# Altium PCB ledcube_v2.PcbDoc (part 15 of 18)
Units mil, origin at the board's own origin, x right, y up, seen from the top; angles counter-clockwise.
Board outline 3130 x 3300 mil, 2 copper layers (Top Layer, Bottom Layer); 188 components, 216 nets, 29515 pads, 250 vias.
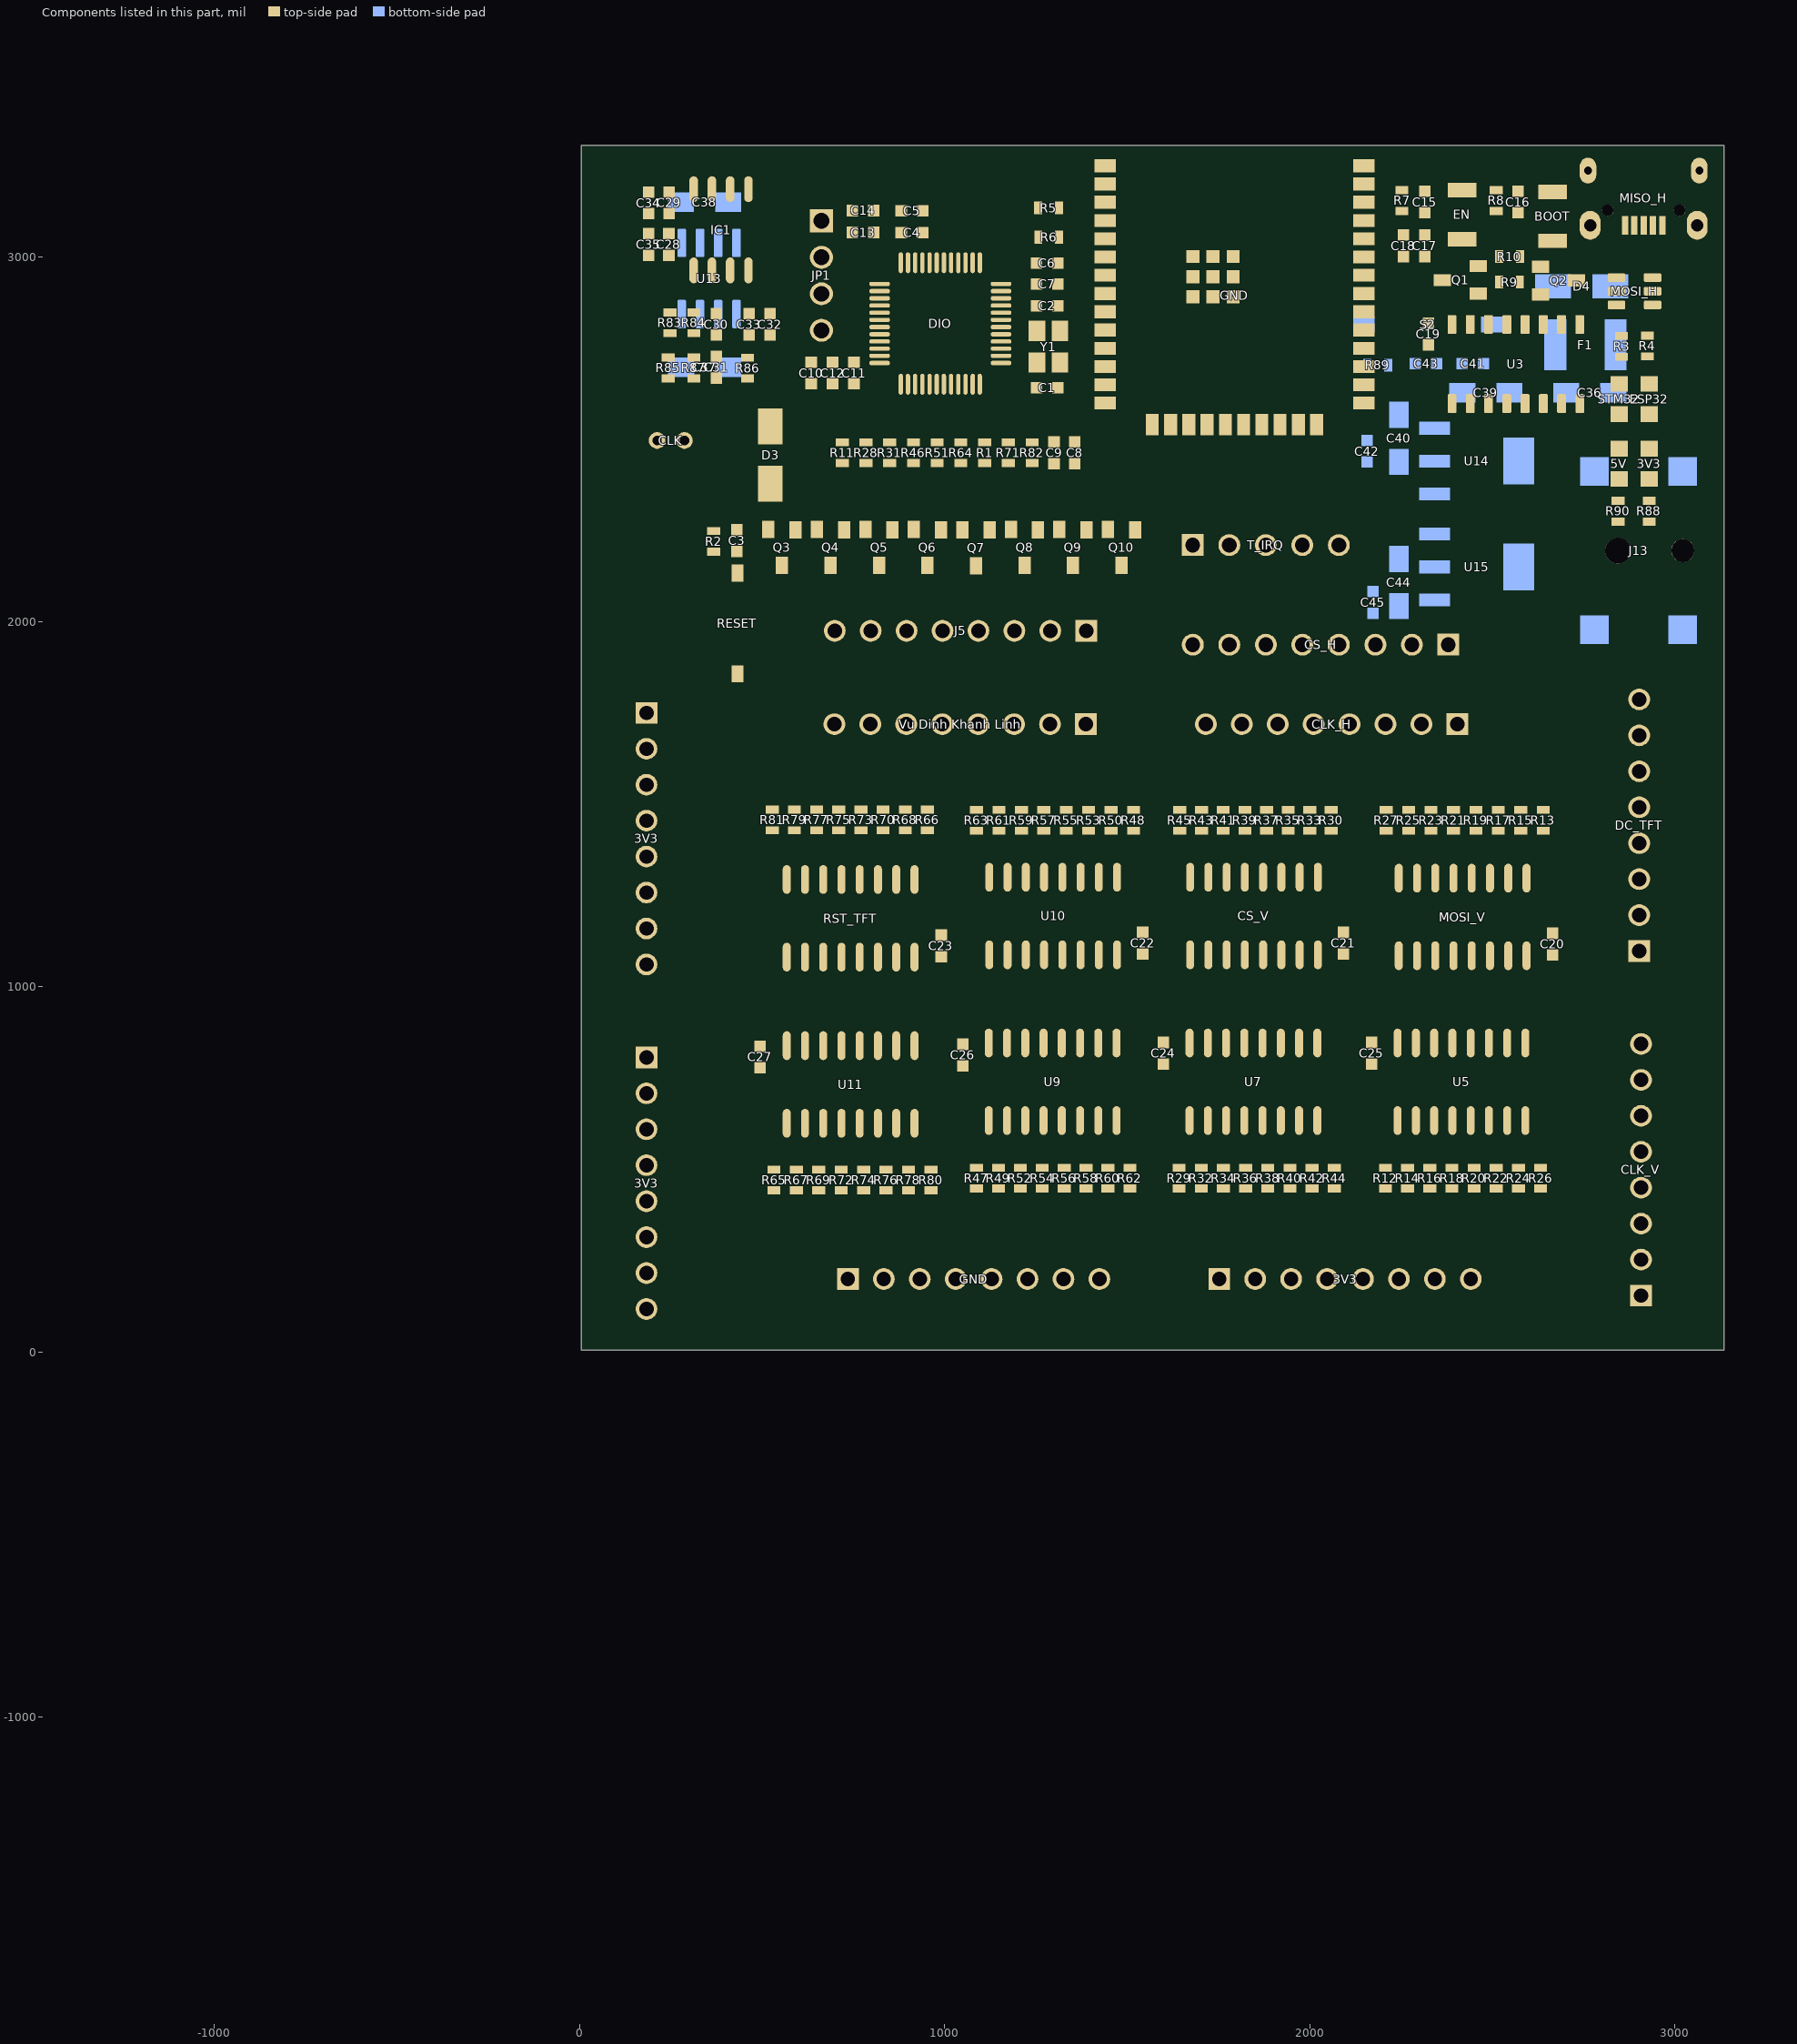
[diagram p14: the components of this part, seen from the top]

## Free pads (board coordinates) (continued)
  round 0 on Mech16: 1(-1371.73,-1737.12) 1(-1371.73,-1736.88) 1(-1371.73,-1736.88) 1(-1371.73,-1737.07) 1(-1371.73,-1737.07) 1(-1371.73,-1736.87) 1(-1371.73,-1736.87) 1(-1371.73,-1736.91) 1(-1371.73,-1736.91) 1(-1371.73,-1737.01) 1(-1371.73,-1737.01) 1(-1371.73,-1737.28) 1(-1371.73,-1737.28) 1(-1371.73,-1737.24) 1(-1371.73,-1737.24) 1(-1371.73,-1737.12) 1(-1371.73,-1737.12) 1(-1371.73,-1737.07) 1(-1371.73,-1737.07) 1(-1371.73,-1737.01) 1(-1371.73,-1737.01) 1(-1371.73,-1736.97) 1(-1371.73,-1736.97) 1(-1371.73,-1736.95) 1(-1371.73,-1736.95) 1(-1371.73,-1736.88) 1(-1371.73,-1736.88) 1(-1371.73,-1736.94) 1(-1371.73,-1736.94) 1(-1371.73,-1737.03) 1(-1371.73,-1737.03) 1(-1371.73,-1737.16) 1(-1371.73,-1737.16) 1(-1371.73,-1737.14) 1(-1371.73,-1737.14) 1(-1371.73,-1737.08) 1(-1371.73,-1737.08) 1(-1371.73,-1737) 1(-1371.73,-1737) 1(-1371.73,-1736.99) 1(-1371.73,-1736.99) 1(-1371.73,-1737.28) 1(-1371.73,-1737.28) 1(-1371.73,-1737.12) 1(-1371.73,-1737.12) 1(-1371.73,-1737.04) 1(-1371.73,-1737.04) 1(-1371.73,-1737) 1(-1371.73,-1737) 1(-1371.73,-1737.28) 1(-1371.73,-1737.28) 1(-1371.72,-1737.11) 1(-1371.72,-1737.11) 1(-1371.72,-1737.03) 1(-1371.72,-1737.03) 1(-1371.72,-1736.99) 1(-1371.72,-1736.99) 1(-1371.72,-1737.05) 1(-1371.72,-1737.05) 1(-1371.72,-1736.97) 1(-1371.72,-1736.97) 1(-1371.72,-1736.95) 1(-1371.72,-1736.95) 1(-1371.72,-1737.11) 1(-1371.72,-1737.11) 1(-1371.72,-1737.01) 1(-1371.72,-1737.01) 1(-1371.72,-1737.04) 1(-1371.72,-1737.04) 1(-1371.72,-1736.91) 1(-1371.72,-1736.91) 1(-1371.72,-1736.87) 1(-1371.72,-1736.87) 1(-1371.72,-1737.11) 1(-1371.72,-1737.11) 1(-1371.72,-1737.01) 1(-1371.72,-1737.01) 1(-1371.72,-1737.24) 1(-1371.72,-1737.24) 1(-1371.72,-1737.28) 1(-1371.72,-1737.28) 1(-1371.72,-1737.07) 1(-1371.72,-1737.07) 1(-1371.72,-1736.99) 1(-1371.72,-1736.99) 1(-1371.72,-1736.91) 1(-1371.72,-1736.91) 1(-1371.72,-1736.97) 1(-1371.72,-1736.97) 1(-1371.72,-1736.95) 1(-1371.72,-1736.95) 1(-1371.72,-1737.14) 1(-1371.72,-1737.14) 1(-1371.72,-1737.04) 1(-1371.72,-1737.04) 1(-1371.72,-1736.97) 1(-1371.72,-1736.97) 1(-1371.72,-1737.08) 1(-1371.72,-1737.08) 1(-1371.72,-1737.06) 1(-1371.72,-1737.06) 1(-1371.72,-1736.92) 1(-1371.72,-1736.92) 1(-1371.72,-1737.02) 1(-1371.72,-1737.02) 1(-1371.72,-1737.28) 1(-1371.72,-1737.28) 1(-1371.72,-1736.97) 1(-1371.72,-1736.97) 1(-1371.72,-1736.95) 1(-1371.72,-1736.95) 1(-1371.72,-1737.01) 1(-1371.72,-1737.01) 1(-1371.72,-1736.92) 1(-1371.72,-1736.92) 1(-1371.72,-1737.12) 1(-1371.72,-1737.12) 1(-1371.72,-1737.08) 1(-1371.72,-1737.08) 1(-1371.72,-1737.06) 1(-1371.72,-1737.06) 1(-1371.72,-1737.06) 1(-1371.72,-1737.06) 1(-1371.72,-1737.05) 1(-1371.72,-1737.05) 1(-1371.72,-1737.04) 1(-1371.72,-1737.04) 1(-1371.72,-1736.99) 1(-1371.72,-1736.99) 1(-1371.72,-1737.11) 1(-1371.72,-1737.11) 1(-1371.72,-1737.06) 1(-1371.72,-1737.06) 1(-1371.72,-1737.04) 1(-1371.72,-1737.04) 1(-1371.72,-1736.96) 1(-1371.72,-1736.96) 1(-1371.72,-1737.06) 1(-1371.72,-1737.06) 1(-1371.72,-1736.92) 1(-1371.72,-1736.92) 1(-1371.72,-1736.88) 1(-1371.72,-1736.88) 1(-1371.72,-1737.02) 1(-1371.72,-1737.02) 1(-1371.72,-1737.05) 1(-1371.72,-1737.05) 1(-1371.72,-1737) 1(-1371.72,-1737) 1(-1371.72,-1737) 1(-1371.72,-1737) 1(-1371.72,-1736.97) 1(-1371.72,-1736.97) 1(-1371.72,-1737.08) 1(-1371.72,-1737.08) 1(-1371.72,-1737.06) 1(-1371.72,-1737.06) 1(-1371.72,-1737.02) 1(-1371.72,-1737.02) 1(-1371.72,-1736.88) 1(-1371.72,-1736.88) 1(-1371.72,-1736.94) 1(-1371.72,-1736.94) 1(-1371.72,-1737.04) 1(-1371.72,-1737.04) 1(-1371.72,-1737.11) 1(-1371.72,-1737.11) 1(-1371.72,-1737.11) 1(-1371.72,-1737.11) 1(-1371.72,-1737.03) 1(-1371.72,-1737.03) 1(-1371.72,-1736.97) 1(-1371.72,-1736.97) 1(-1371.72,-1737.24) 1(-1371.72,-1737.24) 1(-1371.72,-1737.03) 1(-1371.72,-1737.03) 1(-1371.72,-1736.97) 1(-1371.72,-1736.97) 1(-1371.72,-1736.96) 1(-1371.72,-1736.96) 1(-1371.72,-1737.17) 1(-1371.72,-1737.17) 1(-1371.72,-1736.96) 1(-1371.72,-1736.96) 1(-1371.72,-1736.95) 1(-1371.72,-1736.95) 1(-1371.72,-1737.08) 1(-1371.72,-1737.08) 1(-1371.72,-1737.06) 1(-1371.72,-1737.06) 1(-1371.72,-1736.96) 1(-1371.72,-1736.96) 1(-1371.72,-1736.94) 1(-1371.72,-1736.94) 1(-1371.72,-1737.17) 1(-1371.72,-1737.17) 1(-1371.72,-1736.97) 1(-1371.72,-1736.97) 1(-1371.72,-1736.95) 1(-1371.72,-1736.95) 1(-1371.72,-1736.92) 1(-1371.72,-1736.92) 1(-1371.72,-1737.08) 1(-1371.72,-1737.08) 1(-1371.72,-1737.06) 1(-1371.72,-1737.06) 1(-1371.72,-1737.11) 1(-1371.72,-1737.11) 1(-1371.72,-1736.96) 1(-1371.72,-1736.96) 1(-1371.72,-1736.99) 1(-1371.72,-1736.99) 1(-1371.72,-1737.04) 1(-1371.72,-1737.04) 1(-1371.72,-1736.95) 1(-1371.72,-1736.95) 1(-1371.72,-1737.03) 1(-1371.72,-1737.03) 1(-1371.72,-1737.03) 1(-1371.72,-1737.03) 1(-1371.72,-1737) 1(-1371.72,-1737) 1(-1371.72,-1737.19) 1(-1371.72,-1737.19) 1(-1371.72,-1737.14) 1(-1371.72,-1737.14) 1(-1371.72,-1737.01) 1(-1371.72,-1737.01) 1(-1371.72,-1737) 1(-1371.72,-1737) 1(-1371.72,-1736.96) 1(-1371.72,-1736.96) 1(-1371.72,-1737.04) 1(-1371.72,-1737.04) 1(-1371.72,-1737) 1(-1371.72,-1737) 1(-1371.72,-1737.05) 1(-1371.72,-1737.05) 1(-1371.72,-1736.98) 1(-1371.72,-1736.98) 1(-1371.72,-1737.04) 1(-1371.72,-1737.04) 1(-1371.72,-1737.02) 1(-1371.72,-1737.02) 1(-1371.72,-1737.01) 1(-1371.72,-1737.01) 1(-1371.72,-1737.01) 1(-1371.72,-1737.01) 1(-1371.72,-1736.97) 1(-1371.72,-1736.97) 1(-1371.72,-1737.05) 1(-1371.72,-1737.05) 1(-1371.72,-1737.03) 1(-1371.72,-1737.03) 1(-1371.72,-1737.09) 1(-1371.72,-1737.09) 1(-1371.72,-1737.08) 1(-1371.72,-1737.08) 1(-1371.72,-1737.07) 1(-1371.72,-1737.07) 1(-1371.72,-1736.88) 1(-1371.72,-1736.88) 1(-1371.72,-1737.11) 1(-1371.72,-1737.11) 1(-1371.72,-1737) 1(-1371.72,-1737) 1(-1371.72,-1737.08) 1(-1371.72,-1737.08) 1(-1371.72,-1737.03) 1(-1371.72,-1737.03) 1(-1371.72,-1737.07) 1(-1371.72,-1737.07) 1(-1371.72,-1737.06) 1(-1371.72,-1737.06) 1(-1371.72,-1737.04) 1(-1371.72,-1737.04) 1(-1371.72,-1736.96) 1(-1371.72,-1736.96) 1(-1371.71,-1737.07) 1(-1371.71,-1737.07) 1(-1371.71,-1737.02) 1(-1371.71,-1737.02) 1(-1371.71,-1737) 1(-1371.71,-1737) 1(-1371.71,-1736.98) 1(-1371.71,-1736.98) 1(-1371.71,-1737.28) 1(-1371.71,-1737.28) 1(-1371.71,-1737.08) 1(-1371.71,-1737.08) 1(-1371.71,-1736.88) 1(-1371.71,-1736.88) 1(-1371.71,-1736.89) 1(-1371.71,-1736.89) 1(-1371.71,-1737.06) 1(-1371.71,-1737.06) 1(-1371.71,-1736.98) 1(-1371.71,-1736.98) 1(-1371.71,-1737.02) 1(-1371.71,-1737.02) 1(-1371.71,-1737.28) 1(-1371.71,-1737.28) 1(-1371.71,-1736.92) 1(-1371.71,-1736.92) 1(-1371.71,-1737.01) 1(-1371.71,-1737.01) 1(-1371.71,-1736.92) 1(-1371.71,-1736.92) 1(-1371.71,-1736.88) 1(-1371.71,-1736.88) 1(-1371.71,-1737.07) 1(-1371.71,-1737.07) 1(-1371.71,-1736.92) 1(-1371.71,-1736.92) 1(-1371.71,-1737.06) 1(-1371.71,-1737.06) 1(-1371.71,-1736.92) 1(-1371.71,-1736.92) 1(-1371.71,-1737.02) 1(-1371.71,-1737.02) 1(-1371.71,-1737.28) 1(-1371.71,-1737.28) 1(-1371.71,-1737.02) 1(-1371.71,-1737.02) 1(-1371.71,-1737.06) 1(-1371.71,-1737.06) 1(-1371.71,-1736.88) 1(-1371.71,-1736.88) 1(-1371.71,-1736.88) 1(-1371.71,-1736.88) 1(-1371.71,-1737.03) 1(-1371.71,-1737.03) 1(-1371.71,-1737.04) 1(-1371.71,-1737.04) 1(-1371.71,-1736.89) 1(-1371.71,-1736.89) 1(-1371.71,-1736.92) 1(-1371.71,-1736.92) 1(-1371.71,-1736.88) 1(-1371.71,-1736.88) 1(-1371.71,-1737.09) 1(-1371.71,-1737.09) 1(-1371.71,-1736.96) 1(-1371.71,-1736.96) 1(-1371.71,-1736.89) 1(-1371.71,-1736.89) 1(-1371.71,-1737.28) 1(-1371.71,-1737.28) 1(-1371.71,-1737.14) 1(-1371.71,-1737.14) 1(-1371.71,-1736.99) 1(-1371.71,-1736.99) 1(-1371.71,-1737.06) 1(-1371.71,-1737.06) 1(-1371.71,-1736.94) 1(-1371.71,-1736.94) 1(-1371.71,-1736.98) 1(-1371.71,-1736.98) 1(-1371.71,-1737.06) 1(-1371.71,-1737.06) 1(-1371.71,-1737.02) 1(-1371.71,-1737.02) 1(-1371.71,-1737.17) 1(-1371.71,-1737.17) 1(-1371.71,-1737.12) 1(-1371.71,-1737.12) 1(-1371.71,-1737.06) 1(-1371.71,-1737.06) 1(-1371.71,-1737.04) 1(-1371.71,-1737.04) 1(-1371.71,-1736.92) 1(-1371.71,-1736.92) 1(-1371.71,-1737.28) 1(-1371.71,-1737.28) 1(-1371.71,-1737.11) 1(-1371.71,-1737.11) 1(-1371.71,-1736.92) 1(-1371.71,-1736.92) 1(-1371.71,-1737.06) 1(-1371.71,-1737.06) 1(-1371.71,-1736.93) 1(-1371.71,-1736.93) 1(-1371.71,-1737.24) 1(-1371.71,-1737.24) 1(-1371.71,-1737.12) 1(-1371.71,-1737.12) 1(-1371.71,-1737.19) 1(-1371.71,-1737.19) 1(-1371.71,-1736.95) 1(-1371.71,-1736.95) 1(-1371.71,-1736.94) 1(-1371.71,-1736.94) 1(-1371.71,-1737.05) 1(-1371.71,-1737.05) 1(-1371.71,-1736.97) 1(-1371.71,-1736.97) 1(-1371.71,-1736.92) 1(-1371.71,-1736.92) 1(-1371.71,-1736.94) 1(-1371.71,-1736.94) 1(-1371.71,-1737.09) 1(-1371.71,-1737.09) 1(-1371.71,-1736.95) 1(-1371.71,-1736.95) 1(-1371.71,-1737.03) 1(-1371.71,-1737.03) 1(-1371.71,-1736.99) 1(-1371.71,-1736.99) 1(-1371.7,-1737.09) 1(-1371.7,-1737.09) 1(-1371.7,-1737.05) 1(-1371.7,-1737.05) 1(-1371.7,-1736.94) 1(-1371.7,-1736.94) 1(-1371.7,-1737.17) 1(-1371.7,-1737.17) 1(-1371.7,-1737) 1(-1371.7,-1737) 1(-1371.7,-1736.93) 1(-1371.7,-1736.93) 1(-1371.7,-1737.06) 1(-1371.7,-1737.06) 1(-1371.7,-1737.01) 1(-1371.7,-1737.01) 1(-1371.7,-1737.08) 1(-1371.7,-1737.08) 1(-1371.7,-1737.06) 1(-1371.7,-1737.06) 1(-1371.7,-1737.08) 1(-1371.7,-1737.08) 1(-1371.7,-1737.07) 1(-1371.7,-1737.07) 1(-1371.7,-1737.06) 1(-1371.7,-1737.06) 1(-1371.7,-1736.89) 1(-1371.7,-1736.89) 1(-1371.7,-1737.06) 1(-1371.7,-1737.06) 1(-1371.7,-1737.01) 1(-1371.7,-1737.01) 1(-1371.7,-1736.96) 1(-1371.7,-1736.96) 1(-1371.7,-1736.89) 1(-1371.7,-1736.89) 1(-1371.7,-1737.14) 1(-1371.7,-1737.14) 1(-1371.7,-1737.02) 1(-1371.7,-1737.02) 1(-1371.7,-1737) 1(-1371.7,-1737) 1(-1371.7,-1737.03) 1(-1371.7,-1737.03) 1(-1371.7,-1737.17) 1(-1371.7,-1737.17) 1(-1371.7,-1736.93) 1(-1371.7,-1736.93) 1(-1371.7,-1737.19) 1(-1371.7,-1737.19) 1(-1371.7,-1737.02) 1(-1371.7,-1737.02) 1(-1371.7,-1737.02) 1(-1371.7,-1737.02) 1(-1371.7,-1736.98) 1(-1371.7,-1736.98) 1(-1371.7,-1737.02) 1(-1371.7,-1737.02) 1(-1371.7,-1736.88) 1(-1371.7,-1736.88) 1(-1371.7,-1737.19) 1(-1371.7,-1737.19) 1(-1371.7,-1737.17) 1(-1371.7,-1737.17) 1(-1371.7,-1737.02) 1(-1371.7,-1737.02) 1(-1371.7,-1737.11) 1(-1371.7,-1737.11) 1(-1371.7,-1737.05) 1(-1371.7,-1737.05) 1(-1371.7,-1737.18) 1(-1371.7,-1737.18) 1(-1371.7,-1737.14) 1(-1371.7,-1737.14) 1(-1371.7,-1737.18) 1(-1371.7,-1737.18) 1(-1371.7,-1737.12) 1(-1371.7,-1737.12) 1(-1371.7,-1736.93) 1(-1371.7,-1736.93) 1(-1371.7,-1736.88) 1(-1371.7,-1736.88) 1(-1371.7,-1737.06) 1(-1371.7,-1737.06) 1(-1371.7,-1736.98) 1(-1371.7,-1736.98) 1(-1371.7,-1737.06) 1(-1371.7,-1737.06) 1(-1371.7,-1736.99) 1(-1371.7,-1736.99) 1(-1371.7,-1737.28) 1(-1371.7,-1737.28) 1(-1371.7,-1737.11) 1(-1371.7,-1737.11) 1(-1371.7,-1737.12) 1(-1371.7,-1737.12) 1(-1371.7,-1736.98) 1(-1371.7,-1736.98) 1(-1371.7,-1737.14) 1(-1371.7,-1737.14) 1(-1371.7,-1736.93) 1(-1371.7,-1736.93) 1(-1371.7,-1736.93) 1(-1371.7,-1736.93) 1(-1371.7,-1737.12) 1(-1371.7,-1737.12) 1(-1371.7,-1737.15) 1(-1371.7,-1737.15) 1(-1371.7,-1736.93) 1(-1371.7,-1736.93) 1(-1371.7,-1737.17) 1(-1371.7,-1737.17) 1(-1371.7,-1737.16) 1(-1371.7,-1737.16) 1(-1371.7,-1737.12) 1(-1371.7,-1737.12) 1(-1371.7,-1737.11) 1(-1371.7,-1737.11) 1(-1371.7,-1736.88) 1(-1371.7,-1736.88) 1(-1371.7,-1736.97) 1(-1371.7,-1736.97) 1(-1371.7,-1736.88) 1(-1371.7,-1736.88) 1(-1371.7,-1736.89) 1(-1371.7,-1736.89) 1(-1371.7,-1737.11) 1(-1371.7,-1737.11) 1(-1371.7,-1736.89) 1(-1371.7,-1736.89) 1(-1371.7,-1737.09) 1(-1371.7,-1737.09) 1(-1371.7,-1736.96) 1(-1371.7,-1736.96) 1(-1371.7,-1736.98) 1(-1371.7,-1736.98) 1(-1371.69,-1737.11) 1(-1371.69,-1737.11) 1(-1371.69,-1737.04) 1(-1371.69,-1737.04) 1(-1371.69,-1736.99) 1(-1371.69,-1736.99) 1(-1371.69,-1737.27) 1(-1371.69,-1737.27) 1(-1371.69,-1737.26) 1(-1371.69,-1737.26) 1(-1371.69,-1737.24) 1(-1371.69,-1737.24) 1(-1371.69,-1736.99) 1(-1371.69,-1736.99) 1(-1371.69,-1737.11) 1(-1371.69,-1737.11) 1(-1371.69,-1737.15) 1(-1371.69,-1737.15) 1(-1371.69,-1737.12) 1(-1371.69,-1737.12) 1(-1371.69,-1737.06) 1(-1371.69,-1737.06) 1(-1371.69,-1737.19) 1(-1371.69,-1737.19) 1(-1371.69,-1736.97) 1(-1371.69,-1736.97) 1(-1371.69,-1737.02) 1(-1371.69,-1737.02) 1(-1371.69,-1737.19) 1(-1371.69,-1737.19) 1(-1371.69,-1736.93) 1(-1371.69,-1736.93) 1(-1371.69,-1737.06) 1(-1371.69,-1737.06) 1(-1371.69,-1737.11) 1(-1371.69,-1737.11) 1(-1371.69,-1737.06) 1(-1371.69,-1737.06) 1(-1371.69,-1736.99) 1(-1371.69,-1736.99) 1(-1371.69,-1737.04) 1(-1371.69,-1737.04) 1(-1371.69,-1736.97) 1(-1371.69,-1736.97) 1(-1371.69,-1736.96) 1(-1371.69,-1736.96) 1(-1371.69,-1736.95) 1(-1371.69,-1736.95) 1(-1371.69,-1736.94) 1(-1371.69,-1736.94) 1(-1371.69,-1737.2) 1(-1371.69,-1737.2) 1(-1371.69,-1737.12) 1(-1371.69,-1737.12) 1(-1371.69,-1736.93) 1(-1371.69,-1736.93) 1(-1371.69,-1737.19) 1(-1371.69,-1737.19) 1(-1371.69,-1736.99) 1(-1371.69,-1736.99) 1(-1371.69,-1737) 1(-1371.69,-1737) 1(-1371.69,-1736.95) 1(-1371.69,-1736.95) 1(-1371.69,-1736.95) 1(-1371.69,-1736.95) 1(-1371.69,-1737.06) 1(-1371.69,-1737.06) 1(-1371.69,-1737.19) 1(-1371.69,-1737.19) 1(-1371.69,-1737.15) 1(-1371.69,-1737.15) 1(-1371.69,-1736.99) 1(-1371.69,-1736.99) 1(-1371.69,-1736.93) 1(-1371.69,-1736.93) 1(-1371.69,-1737.03) 1(-1371.69,-1737.03) 1(-1371.69,-1737.02) 1(-1371.69,-1737.02) 1(-1371.69,-1736.98) 1(-1371.69,-1736.98) 1(-1371.69,-1737.01) 1(-1371.69,-1737.01) 1(-1371.69,-1737) 1(-1371.69,-1737) 1(-1371.69,-1736.97) 1(-1371.69,-1736.97) 1(-1371.69,-1736.97) 1(-1371.69,-1736.97) 1(-1371.69,-1736.88) 1(-1371.69,-1736.88) 1(-1371.69,-1736.99) 1(-1371.69,-1736.99) 1(-1371.69,-1737.08) 1(-1371.69,-1737.08) 1(-1371.69,-1736.96) 1(-1371.69,-1736.96) 1(-1371.69,-1736.97) 1(-1371.69,-1736.97) 1(-1371.69,-1736.96) 1(-1371.69,-1736.96) 1(-1371.69,-1736.98) 1(-1371.69,-1736.98) 1(-1371.69,-1737) 1(-1371.69,-1737) 1(-1371.69,-1737.04) 1(-1371.69,-1737.04) 1(-1371.69,-1736.94) 1(-1371.69,-1736.94) 1(-1371.69,-1736.89) 1(-1371.69,-1736.89) 1(-1371.69,-1737.01) 1(-1371.69,-1737.01) 1(-1371.69,-1736.88) 1(-1371.69,-1736.88) 1(-1371.69,-1736.89) 1(-1371.69,-1736.89) 1(-1371.69,-1737.03) 1(-1371.69,-1737.03) 1(-1371.69,-1737) 1(-1371.69,-1737) 1(-1371.69,-1737.08) 1(-1371.69,-1737.08) 1(-1371.69,-1736.93) 1(-1371.69,-1736.93) 1(-1371.69,-1737.15) 1(-1371.69,-1737.15) 1(-1371.69,-1737.07) 1(-1371.69,-1737.07) 1(-1371.69,-1737.04) 1(-1371.69,-1737.04) 1(-1371.69,-1736.97) 1(-1371.69,-1736.97) 1(-1371.69,-1736.96) 1(-1371.69,-1736.96) 1(-1371.69,-1736.95) 1(-1371.69,-1736.95) 1(-1371.69,-1736.93) 1(-1371.69,-1736.93) 1(-1371.69,-1737.08) 1(-1371.69,-1737.08) 1(-1371.69,-1736.88) 1(-1371.69,-1736.88) 1(-1371.69,-1736.89) 1(-1371.69,-1736.89) 1(-1371.69,-1737.18) 1(-1371.69,-1737.18) 1(-1371.69,-1737.12) 1(-1371.69,-1737.12) 1(-1371.69,-1736.99) 1(-1371.69,-1736.99) 1(-1371.69,-1736.95) 1(-1371.69,-1736.95) 1(-1371.69,-1736.92) 1(-1371.69,-1736.92) 1(-1371.69,-1737.07) 1(-1371.69,-1737.07) 1(-1371.69,-1736.88) 1(-1371.69,-1736.88) 1(-1371.69,-1737.07) 1(-1371.69,-1737.07) 1(-1371.69,-1737.06) 1(-1371.69,-1737.06) 1(-1371.69,-1737.02) 1(-1371.69,-1737.02) 1(-1371.69,-1736.96) 1(-1371.69,-1736.96) 1(-1371.69,-1736.92) 1(-1371.69,-1736.92) 1(-1371.69,-1736.88) 1(-1371.69,-1736.88) 1(-1371.69,-1736.98) 1(-1371.69,-1736.98) 1(-1371.69,-1737.19) 1(-1371.69,-1737.19) 1(-1371.69,-1736.98) 1(-1371.69,-1736.98) 1(-1371.69,-1736.97) 1(-1371.69,-1736.97) 1(-1371.69,-1736.96) 1(-1371.69,-1736.96) 1(-1371.69,-1737.11) 1(-1371.69,-1737.11) 1(-1371.69,-1737.08) 1(-1371.69,-1737.08) 1(-1371.69,-1737.01) 1(-1371.69,-1737.01) 1(-1371.69,-1736.96) 1(-1371.69,-1736.96) 1(-1371.69,-1736.95) 1(-1371.69,-1736.95) 1(-1371.69,-1737.29) 1(-1371.69,-1737.29) 1(-1371.69,-1737.08) 1(-1371.69,-1737.08) 1(-1371.69,-1737.04) 1(-1371.69,-1737.04) 1(-1371.69,-1736.98) 1(-1371.69,-1736.98) 1(-1371.69,-1736.97) 1(-1371.69,-1736.97) 1(-1371.69,-1736.92) 1(-1371.69,-1736.92) 1(-1371.69,-1736.95) 1(-1371.69,-1736.95) 1(-1371.69,-1736.95) 1(-1371.69,-1736.95) 1(-1371.69,-1736.89) 1(-1371.69,-1736.89) 1(-1371.69,-1736.99) 1(-1371.69,-1736.99) 1(-1371.69,-1737.19) 1(-1371.69,-1737.19) 1(-1371.69,-1737.07) 1(-1371.69,-1737.07) 1(-1371.69,-1737.05) 1(-1371.69,-1737.05) 1(-1371.69,-1737.07) 1(-1371.69,-1737.07) 1(-1371.69,-1737) 1(-1371.69,-1737) 1(-1371.69,-1736.99) 1(-1371.69,-1736.99) 1(-1371.69,-1737.04) 1(-1371.69,-1737.04) 1(-1371.69,-1737.02) 1(-1371.69,-1737.02) 1(-1371.69,-1736.92) 1(-1371.69,-1736.92) 1(-1371.69,-1737.11) 1(-1371.69,-1737.11) 1(-1371.69,-1737.07) 1(-1371.69,-1737.07) 1(-1371.69,-1736.89) 1(-1371.69,-1736.89) 1(-1371.69,-1737.09) 1(-1371.69,-1737.09) 1(-1371.69,-1737.05) 1(-1371.69,-1737.05) 1(-1371.69,-1737.04) 1(-1371.69,-1737.04) 1(-1371.69,-1736.98) 1(-1371.69,-1736.98) 1(-1371.69,-1736.92) 1(-1371.69,-1736.92) 1(-1371.69,-1736.94) 1(-1371.69,-1736.94) 1(-1371.69,-1737.19) 1(-1371.69,-1737.19) 1(-1371.68,-1736.89) 1(-1371.68,-1736.89) 1(-1371.68,-1736.88) 1(-1371.68,-1736.88) 1(-1371.68,-1737.07) 1(-1371.68,-1737.07) 1(-1371.68,-1737.02) 1(-1371.68,-1737.02) 1(-1371.68,-1737.01) 1(-1371.68,-1737.01) 1(-1371.68,-1736.97) 1(-1371.68,-1736.97) 1(-1371.68,-1736.93) 1(-1371.68,-1736.93) 1(-1371.68,-1736.99) 1(-1371.68,-1736.99) 1(-1371.68,-1736.99) 1(-1371.68,-1736.99) 1(-1371.68,-1737.02) 1(-1371.68,-1737.02) 1(-1371.68,-1737.09) 1(-1371.68,-1737.09) 1(-1371.68,-1736.96) 1(-1371.68,-1736.96) 1(-1371.68,-1737.18) 1(-1371.68,-1737.18) 1(-1371.68,-1737.11) 1(-1371.68,-1737.11) 1(-1371.68,-1736.92) 1(-1371.68,-1736.92) 1(-1371.68,-1736.98) 1(-1371.68,-1736.98) 1(-1371.68,-1737.01) 1(-1371.68,-1737.01) 1(-1371.68,-1737) 1(-1371.68,-1737) 1(-1371.68,-1736.99) 1(-1371.68,-1736.99) 1(-1371.68,-1737.07) 1(-1371.68,-1737.07) 1(-1371.68,-1737.11) 1(-1371.68,-1737.11) 1(-1371.68,-1736.95) 1(-1371.68,-1736.95) 1(-1371.68,-1736.95) 1(-1371.68,-1736.95) 1(-1371.68,-1737.09) 1(-1371.68,-1737.09) 1(-1371.68,-1737.15) 1(-1371.68,-1737.15) 1(-1371.68,-1737.12) 1(-1371.68,-1737.12) 1(-1371.68,-1736.96) 1(-1371.68,-1736.96) 1(-1371.68,-1737.07) 1(-1371.68,-1737.07) 1(-1371.68,-1737.1) 1(-1371.68,-1737.1) 1(-1371.68,-1737.04) 1(-1371.68,-1737.04) 1(-1371.68,-1737) 1(-1371.68,-1737) 1(-1371.68,-1736.95) 1(-1371.68,-1736.95) 1(-1371.68,-1736.94) 1(-1371.68,-1736.94) 1(-1371.68,-1736.95) 1(-1371.68,-1736.95) 1(-1371.68,-1736.92) 1(-1371.68,-1736.92) 1(-1371.68,-1737.08) 1(-1371.68,-1737.08) 1(-1371.68,-1737.02) 1(-1371.68,-1737.02) 1(-1371.68,-1736.88) 1(-1371.68,-1736.88) 1(-1371.68,-1737.03) 1(-1371.68,-1737.03) 1(-1371.68,-1737.05) 1(-1371.68,-1737.05) 1(-1371.68,-1736.99) 1(-1371.68,-1736.99) 1(-1371.68,-1736.98) 1(-1371.68,-1736.98) 1(-1371.68,-1737.06) 1(-1371.68,-1737.06) 1(-1371.68,-1737.06) 1(-1371.68,-1737.06) 1(-1371.68,-1736.89) 1(-1371.68,-1736.89) 1(-1371.68,-1737.04) 1(-1371.68,-1737.04) 1(-1371.68,-1737.06) 1(-1371.68,-1737.06) 1(-1371.68,-1737.02) 1(-1371.68,-1737.02) 1(-1371.68,-1736.98) 1(-1371.68,-1736.98) 1(-1371.68,-1736.92) 1(-1371.68,-1736.92) 1(-1371.68,-1736.96) 1(-1371.68,-1736.96) 1(-1371.68,-1736.95) 1(-1371.68,-1736.95) 1(-1371.68,-1736.95) 1(-1371.68,-1736.95) 1(-1371.68,-1737) 1(-1371.68,-1737) 1(-1371.68,-1737.17) 1(-1371.68,-1737.17) 1(-1371.68,-1737.16) 1(-1371.68,-1737.16) 1(-1371.68,-1737.15) 1(-1371.68,-1737.15) 1(-1371.68,-1737.12) 1(-1371.68,-1737.12) 1(-1371.68,-1737.08) 1(-1371.68,-1737.08) 1(-1371.68,-1737.03) 1(-1371.68,-1737.03) 1(-1371.68,-1737.03) 1(-1371.68,-1737.03) 1(-1371.68,-1736.96) 1(-1371.68,-1736.96) 1(-1371.68,-1736.95) 1(-1371.68,-1736.95) 1(-1371.68,-1736.92) 1(-1371.68,-1736.92) 1(-1371.68,-1736.99) 1(-1371.68,-1736.99) 1(-1371.68,-1737.11) 1(-1371.68,-1737.11) 1(-1371.68,-1736.98) 1(-1371.68,-1736.98) 1(-1371.68,-1736.93) 1(-1371.68,-1736.93) 1(-1371.68,-1737.12) 1(-1371.68,-1737.12) 1(-1371.68,-1737.02) 1(-1371.68,-1737.02) 1(-1371.68,-1736.99) 1(-1371.68,-1736.99) 1(-1371.68,-1737.07) 1(-1371.68,-1737.07) 1(-1371.68,-1737.02) 1(-1371.68,-1737.02) 1(-1371.68,-1736.9) 1(-1371.68,-1736.9) 1(-1371.68,-1737.07) 1(-1371.68,-1737.07) 1(-1371.68,-1736.99) 1(-1371.68,-1736.99) 1(-1371.68,-1737.11) 1(-1371.68,-1737.11) 1(-1371.68,-1737.05) 1(-1371.68,-1737.05) 1(-1371.68,-1737.03) 1(-1371.68,-1737.03) 1(-1371.68,-1736.99) 1(-1371.68,-1736.99) 1(-1371.68,-1736.94) 1(-1371.68,-1736.94) 1(-1371.68,-1736.89) 1(-1371.68,-1736.89) 1(-1371.68,-1737.12) 1(-1371.68,-1737.12) 1(-1371.68,-1737.09) 1(-1371.68,-1737.09) 1(-1371.68,-1736.98) 1(-1371.68,-1736.98) 1(-1371.68,-1736.96) 1(-1371.68,-1736.96) 1(-1371.68,-1737.02) 1(-1371.68,-1737.02) 1(-1371.68,-1736.93) 1(-1371.68,-1736.93) 1(-1371.68,-1736.98) 1(-1371.68,-1736.98) 1(-1371.68,-1736.88) 1(-1371.68,-1736.88) 1(-1371.68,-1737.13) 1(-1371.68,-1737.13) 1(-1371.68,-1737.06) 1(-1371.68,-1737.06) 1(-1371.68,-1737.03) 1(-1371.68,-1737.03) 1(-1371.68,-1736.99) 1(-1371.68,-1736.99) 1(-1371.68,-1736.99) 1(-1371.68,-1736.99) 1(-1371.68,-1737.11) 1(-1371.68,-1737.11) 1(-1371.68,-1737.03) 1(-1371.68,-1737.03) 1(-1371.68,-1737.18) 1(-1371.68,-1737.18) 1(-1371.68,-1737.14) 1(-1371.68,-1737.14) 1(-1371.68,-1737.07) 1(-1371.68,-1737.07) 1(-1371.68,-1737.06) 1(-1371.68,-1737.06) 1(-1371.68,-1736.99) 1(-1371.68,-1736.99) 1(-1371.68,-1736.98) 1(-1371.68,-1736.98) 1(-1371.68,-1736.89) 1(-1371.68,-1736.89) 1(-1371.68,-1737.18) 1(-1371.68,-1737.18) 1(-1371.68,-1737.13) 1(-1371.68,-1737.13) 1(-1371.68,-1737.06) 1(-1371.68,-1737.06) 1(-1371.68,-1737.07) 1(-1371.68,-1737.07) 1(-1371.68,-1737.09) 1(-1371.68,-1737.09) 1(-1371.68,-1737.18) 1(-1371.68,-1737.18) 1(-1371.68,-1737.14) 1(-1371.68,-1737.14) 1(-1371.68,-1736.9) 1(-1371.68,-1736.9) 1(-1371.68,-1737.17) 1(-1371.68,-1737.17) 1(-1371.68,-1737.13) 1(-1371.68,-1737.13) 1(-1371.68,-1737.06) 1(-1371.68,-1737.06) 1(-1371.68,-1737.06) 1(-1371.68,-1737.06) 1(-1371.68,-1737.02) 1(-1371.68,-1737.02) 1(-1371.68,-1737.07) 1(-1371.68,-1737.07) 1(-1371.68,-1737.06) 1(-1371.68,-1737.06) 1(-1371.68,-1737.03) 1(-1371.68,-1737.03) 1(-1371.68,-1737.06) 1(-1371.68,-1737.06) 1(-1371.68,-1736.93) 1(-1371.68,-1736.93) 1(-1371.68,-1737.14) 1(-1371.68,-1737.14) 1(-1371.68,-1737.19) 1(-1371.68,-1737.19) 1(-1371.68,-1737.12) 1(-1371.68,-1737.12) 1(-1371.68,-1737.11) 1(-1371.68,-1737.11) 1(-1371.68,-1737.09) 1(-1371.68,-1737.09) 1(-1371.68,-1737.17) 1(-1371.68,-1737.17) 1(-1371.68,-1736.9) 1(-1371.68,-1736.9) 1(-1371.68,-1737.13) 1(-1371.68,-1737.13) 1(-1371.68,-1736.89) 1(-1371.68,-1736.89) 1(-1371.67,-1737.14) 1(-1371.67,-1737.14) 1(-1371.67,-1736.89) 1(-1371.67,-1736.89) 1(-1371.67,-1736.9) 1(-1371.67,-1736.9) 1(-1371.67,-1736.89) 1(-1371.67,-1736.89) 1(-1371.67,-1737.18) 1(-1371.67,-1737.18) 1(-1371.67,-1736.89) 1(-1371.67,-1736.89) 1(-1371.67,-1737.13) 1(-1371.67,-1737.13) 1(-1371.67,-1736.89) 1(-1371.67,-1736.89) 1(-1371.67,-1737.17) 1(-1371.67,-1737.17) 1(-1371.67,-1736.9) 1(-1371.67,-1736.9) 1(-1371.67,-1737.17) 1(-1371.67,-1737.17) 1(-1371.67,-1737.12) 1(-1371.67,-1737.12) 1(-1371.67,-1736.94) 1(-1371.67,-1736.94) 1(-1371.67,-1736.89) 1(-1371.67,-1736.89) 1(-1371.67,-1736.9) 1(-1371.67,-1736.9) 1(-1371.67,-1737.13) 1(-1371.67,-1737.13) 1(-1371.67,-1737.12) 1(-1371.67,-1737.12) 1(-1371.67,-1737.12) 1(-1371.67,-1737.12) 1(-1371.67,-1737) 1(-1371.67,-1737) 1(-1371.67,-1737) 1(-1371.67,-1737) 1(-1371.67,-1736.89) 1(-1371.67,-1736.89) 1(-1371.67,-1737.01) 1(-1371.67,-1737.01) 1(-1371.67,-1736.91) 1(-1371.67,-1736.91) 1(-1371.67,-1737.12) 1(-1371.67,-1737.12) 1(-1371.67,-1737.18) 1(-1371.67,-1737.18) 1(-1371.67,-1737.12) 1(-1371.67,-1737.12) 1(-1371.67,-1737.11) 1(-1371.67,-1737.11) 1(-1371.67,-1737.1) 1(-1371.67,-1737.1) 1(-1371.67,-1737) 1(-1371.67,-1737) 1(-1371.67,-1736.9) 1(-1371.67,-1736.9) 1(-1371.67,-1736.89) 1(-1371.67,-1736.89) 1(-1371.67,-1737.15) 1(-1371.67,-1737.15) 1(-1371.67,-1737.01) 1(-1371.67,-1737.01) 1(-1371.67,-1736.9) 1(-1371.67,-1736.9) 1(-1371.67,-1736.89) 1(-1371.67,-1736.89) 1(-1371.67,-1736.94) 1(-1371.67,-1736.94) 1(-1371.67,-1737) 1(-1371.67,-1737) 1(-1371.67,-1736.94) 1(-1371.67,-1736.94) 1(-1371.67,-1737.17) 1(-1371.67,-1737.17) 1(-1371.67,-1737.12) 1(-1371.67,-1737.12) 1(-1371.66,-1736.94) 1(-1371.66,-1736.94) 1(-1371.66,-1736.94) 1(-1371.66,-1736.94) 1(-1371.66,-1737) 1(-1371.66,-1737) 1(-1371.66,-1736.9) 1(-1371.66,-1736.9) 1(-1371.66,-1736.9) 1(-1371.66,-1736.9) 1(-1371.66,-1737.15) 1(-1371.66,-1737.15) 1(-1371.66,-1736.94) 1(-1371.66,-1736.94) 1(-1371.66,-1737) 1(-1371.66,-1737) 1(-1371.66,-1737.01) 1(-1371.66,-1737.01) 1(-1371.66,-1737.12) 1(-1371.66,-1737.12) 1(-1371.66,-1737) 1(-1371.66,-1737) 1(-1371.66,-1737.13) 1(-1371.66,-1737.13) 1(-1371.66,-1737.12) 1(-1371.66,-1737.12) 1(-1371.66,-1737.12) 1(-1371.66,-1737.12) 1(-1371.66,-1737.12) 1(-1371.66,-1737.12) 1(-1371.66,-1737) 1(-1371.66,-1737) 1(-1371.66,-1736.94) 1(-1371.66,-1736.94) 1(-1371.66,-1737.13) 1(-1371.66,-1737.13) 1(-1371.66,-1737.12) 1(-1371.66,-1737.12) 1(-1371.66,-1737.1) 1(-1371.66,-1737.1) 1(-1371.66,-1737.01) 1(-1371.66,-1737.01) 1(-1371.66,-1737.15) 1(-1371.66,-1737.15) 1(-1371.66,-1737.01) 1(-1371.66,-1737.01) 1(-1371.66,-1737.12) 1(-1371.66,-1737.12) 1(-1371.66,-1737.17) 1(-1371.66,-1737.17) 1(-1371.66,-1737.13) 1(-1371.66,-1737.13) 1(-1371.66,-1737.01) 1(-1371.66,-1737.01) 1(-1371.66,-1736.94) 1(-1371.66,-1736.94) 1(-1371.66,-1736.91) 1(-1371.66,-1736.91) 1(-1371.66,-1737.13) 1(-1371.66,-1737.13) 1(-1371.66,-1736.91) 1(-1371.66,-1736.91) 1(-1371.66,-1736.91) 1(-1371.66,-1736.91) 1(-1371.66,-1736.94) 1(-1371.66,-1736.94) 1(-1371.65,-1737.13) 1(-1371.65,-1737.13) 1(-1371.65,-1737.12) 1(-1371.65,-1737.12) 1(-1371.65,-1737.17) 1(-1371.65,-1737.17) 1(-1371.65,-1736.94) 1(-1371.65,-1736.94) 1(-1371.65,-1737.13) 1(-1371.65,-1737.13) 1(-1371.65,-1737.12) 1(-1371.65,-1737.12) 1(-1371.65,-1736.94) 1(-1371.65,-1736.94) 1(-1371.65,-1737.26) 1(-1371.65,-1737.26) 1(-1371.65,-1737.15) 1(-1371.65,-1737.15) 1(-1371.65,-1737.25) 1(-1371.65,-1737.25) 1(-1371.65,-1736.95) 1(-1371.65,-1736.95) 1(-1371.65,-1736.94) 1(-1371.65,-1736.94) 1(-1371.65,-1737.24) 1(-1371.65,-1737.24) 1(-1371.65,-1737.17) 1(-1371.65,-1737.17) 1(-1371.65,-1737.27) 1(-1371.65,-1737.27) 1(-1371.65,-1737.15) 1(-1371.65,-1737.15) 1(-1371.65,-1737.24) 1(-1371.65,-1737.24) 1(-1371.65,-1737.17) 1(-1371.65,-1737.17) 1(-1371.65,-1737.16) 1(-1371.65,-1737.16) 1(-1371.65,-1737.13) 1(-1371.65,-1737.13) 1(-1371.65,-1736.95) 1(-1371.65,-1736.95) 1(-1371.65,-1736.94) 1(-1371.65,-1736.94) 1(-1371.65,-1736.9) 1(-1371.65,-1736.9) 1(-1371.65,-1737.24) 1(-1371.65,-1737.24) 1(-1371.65,-1737.12) 1(-1371.65,-1737.12) 1(-1371.65,-1737.28) 1(-1371.65,-1737.28) 1(-1371.65,-1736.93) 1(-1371.65,-1736.93) 1(-1371.65,-1737.25) 1(-1371.65,-1737.25) 1(-1371.65,-1736.94) 1(-1371.65,-1736.94) 1(-1371.65,-1737.16) 1(-1371.65,-1737.16) 1(-1371.65,-1737.1) 1(-1371.65,-1737.1) 1(-1371.65,-1736.95) 1(-1371.65,-1736.95) 1(-1371.65,-1737.28) 1(-1371.65,-1737.28) 1(-1371.65,-1737.26) 1(-1371.65,-1737.26) 1(-1371.65,-1737.12) 1(-1371.65,-1737.12) 1(-1371.65,-1736.91) 1(-1371.65,-1736.91) 1(-1371.65,-1737.17) 1(-1371.65,-1737.17) 1(-1371.65,-1737.12) 1(-1371.65,-1737.12) 1(-1371.65,-1736.91) 1(-1371.65,-1736.91) 1(-1371.65,-1737.29) 1(-1371.65,-1737.29) 1(-1371.65,-1737.17) 1(-1371.65,-1737.17) 1(-1371.65,-1736.95) 1(-1371.65,-1736.95) 1(-1371.65,-1737.17) 1(-1371.65,-1737.17) 1(-1371.65,-1737.13) 1(-1371.65,-1737.13) 1(-1371.65,-1736.95) 1(-1371.65,-1736.95) 1(-1371.65,-1737.15) 1(-1371.65,-1737.15) 1(-1371.65,-1737.26) 1(-1371.65,-1737.26) 1(-1371.65,-1736.91) 1(-1371.65,-1736.91) 1(-1371.65,-1736.96) 1(-1371.65,-1736.96) 1(-1371.65,-1736.93) 1(-1371.65,-1736.93) 1(-1371.65,-1737.28) 1(-1371.65,-1737.28) 1(-1371.65,-1737.27) 1(-1371.65,-1737.27) 1(-1371.65,-1737.25) 1(-1371.65,-1737.25) 1(-1371.65,-1737.12) 1(-1371.65,-1737.12) 1(-1371.65,-1737.1) 1(-1371.65,-1737.1) 1(-1371.65,-1737.15) 1(-1371.65,-1737.15) 1(-1371.65,-1736.91) 1(-1371.65,-1736.91) 1(-1371.65,-1736.93) 1(-1371.65,-1736.93) 1(-1371.65,-1737.28) 1(-1371.65,-1737.28) 1(-1371.64,-1737.29) 1(-1371.64,-1737.29) 1(-1371.64,-1737.27) 1(-1371.64,-1737.27) 1(-1371.64,-1737.25) 1(-1371.64,-1737.25) 1(-1371.64,-1737.17) 1(-1371.64,-1737.17) 1(-1371.64,-1736.94) 1(-1371.64,-1736.94) 1(-1371.64,-1737.02) 1(-1371.64,-1737.02) 1(-1371.64,-1737.26) 1(-1371.64,-1737.26) 1(-1371.64,-1736.94) 1(-1371.64,-1736.94) 1(-1371.64,-1736.91) 1(-1371.64,-1736.91) 1(-1371.64,-1737.28) 1(-1371.64,-1737.28) 1(-1371.64,-1737.18) 1(-1371.64,-1737.18) 1(-1371.64,-1736.9) 1(-1371.64,-1736.9) 1(-1371.64,-1737.12) 1(-1371.64,-1737.12) 1(-1371.64,-1737.26) 1(-1371.64,-1737.26) 1(-1371.64,-1736.95) 1(-1371.64,-1736.95) 1(-1371.64,-1736.96) 1(-1371.64,-1736.96) 1(-1371.64,-1737.27) 1(-1371.64,-1737.27) 1(-1371.64,-1737.25) 1(-1371.64,-1737.25) 1(-1371.64,-1737.17) 1(-1371.64,-1737.17) 1(-1371.64,-1737.28) 1(-1371.64,-1737.28) 1(-1371.64,-1737.18) 1(-1371.64,-1737.18) 1(-1371.64,-1737.28) 1(-1371.64,-1737.28) 1(-1371.64,-1737.24) 1(-1371.64,-1737.24) 1(-1371.64,-1737.12) 1(-1371.64,-1737.12) 1(-1371.64,-1737.13) 1(-1371.64,-1737.13) 1(-1371.64,-1737.11) 1(-1371.64,-1737.11) 1(-1371.64,-1736.9) 1(-1371.64,-1736.9) 1(-1371.64,-1736.9) 1(-1371.64,-1736.9) 1(-1371.64,-1736.91) 1(-1371.64,-1736.91) 1(-1371.64,-1737.27) 1(-1371.64,-1737.27) 1(-1371.64,-1737.25) 1(-1371.64,-1737.25) 1(-1371.64,-1736.92) 1(-1371.64,-1736.92) 1(-1371.64,-1737.17) 1(-1371.64,-1737.17) 1(-1371.64,-1737.26) 1(-1371.64,-1737.26) 1(-1371.64,-1736.9) 1(-1371.64,-1736.9) 1(-1371.64,-1737.17) 1(-1371.64,-1737.17) 1(-1371.64,-1737.15) 1(-1371.64,-1737.15) 1(-1371.64,-1736.91) 1(-1371.64,-1736.91) 1(-1371.64,-1737.17) 1(-1371.64,-1737.17) 1(-1371.64,-1736.91) 1(-1371.64,-1736.91) 1(-1371.64,-1736.91) 1(-1371.64,-1736.91) 1(-1371.64,-1737.26) 1(-1371.64,-1737.26) 1(-1371.64,-1737.25) 1(-1371.64,-1737.25) 1(-1371.64,-1737.28) 1(-1371.64,-1737.28) 1(-1371.64,-1737.25) 1(-1371.64,-1737.25) 1(-1371.64,-1737.29) 1(-1371.64,-1737.29) 1(-1371.64,-1737.26) 1(-1371.64,-1737.26) 1(-1371.64,-1736.92) 1(-1371.64,-1736.92) 1(-1371.63,-1737.13) 1(-1371.63,-1737.13) 1(-1371.63,-1736.92) 1(-1371.63,-1736.92) 1(-1371.63,-1736.92) 1(-1371.63,-1736.92) 1(-1371.63,-1737.27) 1(-1371.63,-1737.27) 1(-1371.63,-1737.27) 1(-1371.63,-1737.27) 1(-1371.63,-1737.17) 1(-1371.63,-1737.17) 1(-1371.63,-1737.27) 1(-1371.63,-1737.27) 1(-1371.63,-1737.26) 1(-1371.63,-1737.26) 1(-1371.63,-1737.25) 1(-1371.63,-1737.25) 1(-1371.63,-1736.94) 1(-1371.63,-1736.94) 1(-1371.63,-1737.25) 1(-1371.63,-1737.25) 1(-1371.63,-1737.18) 1(-1371.63,-1737.18) 1(-1371.63,-1736.92) 1(-1371.63,-1736.92) 1(-1371.63,-1737.25) 1(-1371.63,-1737.25) 1(-1371.63,-1737.25) 1(-1371.63,-1737.25) 1(-1371.63,-1737.18) 1(-1371.63,-1737.18) 1(-1371.63,-1737.24) 1(-1371.63,-1737.24) 1(-1371.63,-1736.94) 1(-1371.63,-1736.94) 1(-1371.63,-1737.25) 1(-1371.63,-1737.25) 1(-1371.63,-1737.24) 1(-1371.63,-1737.24) 1(-1371.63,-1737.26) 1(-1371.63,-1737.26) 1(-1371.63,-1737.18) 1(-1371.63,-1737.18) 1(-1371.63,-1737.26) 1(-1371.63,-1737.26) 1(-1371.63,-1737.25) 1(-1371.63,-1737.25) 1(-1371.63,-1737.28) 1(-1371.63,-1737.28) 1(-1371.63,-1737.26) 1(-1371.63,-1737.26) 1(-1371.63,-1736.91) 1(-1371.63,-1736.91) 1(-1371.63,-1737.24) 1(-1371.63,-1737.24) 1(-1371.62,-1737.26) 1(-1371.62,-1737.26) 1(-1371.62,-1737.24) 1(-1371.62,-1737.24) 1(-1371.62,-1736.93) 1(-1371.62,-1736.93) 1(-1371.62,-1736.92) 1(-1371.62,-1736.92) 1(-1371.62,-1737.26) 1(-1371.62,-1737.26) 1(-1371.62,-1737.26) 1(-1371.62,-1737.26) 1(-1371.62,-1736.92) 1(-1371.62,-1736.92) 1(-1371.62,-1736.92) 1(-1371.62,-1736.92) 1(-1371.62,-1737.23) 1(-1371.62,-1737.23) 1(-1371.62,-1737.18) 1(-1371.62,-1737.18) 1(-1371.62,-1737.26) 1(-1371.62,-1737.26) 1(-1371.62,-1737.26) 1(-1371.62,-1737.26) 1(-1371.62,-1737.28) 1(-1371.62,-1737.28) 1(-1371.62,-1737.27) 1(-1371.62,-1737.27) 1(-1371.62,-1737.26) 1(-1371.62,-1737.26) 1(-1371.62,-1736.93) 1(-1371.62,-1736.93) 1(-1371.62,-1737.28) 1(-1371.62,-1737.28) 1(-1371.62,-1737.26) 1(-1371.62,-1737.26) 1(-1371.62,-1737.19) 1(-1371.62,-1737.19) 1(-1371.62,-1737.26) 1(-1371.62,-1737.26) 1(-1371.62,-1737.27) 1(-1371.62,-1737.27) 1(-1371.62,-1737.23) 1(-1371.62,-1737.23) 1(-1371.62,-1737.27) 1(-1371.62,-1737.27) 1(-1371.62,-1737.19) 1(-1371.62,-1737.19) 1(-1371.62,-1737.27) 1(-1371.62,-1737.27) 1(-1371.62,-1737.26) 1(-1371.62,-1737.26) 1(-1371.62,-1736.93) 1(-1371.62,-1736.93) 1(-1371.62,-1736.92) 1(-1371.62,-1736.92) 1(-1371.62,-1737.28) 1(-1371.62,-1737.28) 1(-1371.62,-1736.91) 1(-1371.62,-1736.91) 1(-1371.62,-1737.25) 1(-1371.62,-1737.25) 1(-1371.61,-1737.23) 1(-1371.61,-1737.23) 1(-1371.61,-1737.21) 1(-1371.61,-1737.21) 1(-1371.61,-1737.2) 1(-1371.61,-1737.2) 1(-1371.61,-1737.21) 1(-1371.61,-1737.21) 1(-1371.61,-1737.25) 1(-1371.61,-1737.25) 1(-1371.61,-1737.22) 1(-1371.61,-1737.22) 1(-1371.61,-1737.27) 1(-1371.61,-1737.27) 1(-1371.61,-1737.27) 1(-1371.61,-1737.27) 1(-1371.61,-1737.26) 1(-1371.61,-1737.26) 1(-1371.61,-1737.26) 1(-1371.61,-1737.26) 1(-1371.61,-1737.22) 1(-1371.61,-1737.22) 1(-1371.61,-1737.26) 1(-1371.61,-1737.26) 1(-1371.61,-1737.21) 1(-1371.61,-1737.21) 1(-1371.61,-1737.22) 1(-1371.61,-1737.22) 1(-1371.61,-1737.2) 1(-1371.61,-1737.2) 1(-1371.61,-1737.26) 1(-1371.61,-1737.26) 1(-1371.61,-1737.28) 1(-1371.61,-1737.28) 1(-1371.61,-1737.26) 1(-1371.61,-1737.26) 1(-1371.61,-1737.26) 1(-1371.61,-1737.26) 1(-1371.61,-1737.2) 1(-1371.61,-1737.2) 1(-1371.61,-1737.23) 1(-1371.61,-1737.23) 1(-1371.61,-1737.26) 1(-1371.61,-1737.26) 1(-1371.61,-1737.23) 1(-1371.61,-1737.23) 1(-1371.61,-1737.2) 1(-1371.61,-1737.2) 1(-1371.61,-1737.22) 1(-1371.61,-1737.22) 1(-1371.61,-1737.2) 1(-1371.61,-1737.2) 1(-1371.61,-1737.23) 1(-1371.61,-1737.23) 1(-1371.61,-1737.26) 1(-1371.61,-1737.26) 1(-1371.61,-1737.23) 1(-1371.61,-1737.23) 1(-1371.61,-1737.24) 1(-1371.61,-1737.24) 1(-1371.61,-1737.22) 1(-1371.61,-1737.22) 1(-1371.61,-1737.2) 1(-1371.61,-1737.2) 1(-1371.61,-1737.22) 1(-1371.61,-1737.22) 1(-1371.6,-1737.26) 1(-1371.6,-1737.26) 1(-1371.6,-1737.25) 1(-1371.6,-1737.25) 1(-1371.6,-1737.24) 1(-1371.6,-1737.24) 1(-1371.6,-1737.24) 1(-1371.6,-1737.24) 1(-1371.6,-1737.2) 1(-1371.6,-1737.2) 1(-1371.6,-1737.2) 1(-1371.6,-1737.2) 1(-1371.6,-1737.23) 1(-1371.6,-1737.23) 1(-1371.6,-1737.22) 1(-1371.6,-1737.22) 1(-1371.6,-1737.25) 1(-1371.6,-1737.25) 1(-1371.6,-1737.24) 1(-1371.6,-1737.24) 1(-1371.6,-1737.21) 1(-1371.6,-1737.21) 1(-1371.6,-1737.29) 1(-1371.6,-1737.29) 1(-1371.6,-1737.21) 1(-1371.6,-1737.21) 1(-1371.6,-1737.26) 1(-1371.6,-1737.26) 1(-1371.6,-1737.25) 1(-1371.6,-1737.25) 1(-1371.6,-1737.26) 1(-1371.6,-1737.26) 1(-1371.6,-1737.25) 1(-1371.6,-1737.25) 1(-1371.6,-1737.24) 1(-1371.6,-1737.24) 1(-1371.6,-1737.2) 1(-1371.6,-1737.2) 1(-1371.6,-1737.21) 1(-1371.6,-1737.21) 1(-1371.6,-1737.26) 1(-1371.6,-1737.26) 1(-1371.6,-1737.24) 1(-1371.6,-1737.24) 1(-1371.6,-1737.24) 1(-1371.6,-1737.24) 1(-1371.6,-1737.26) 1(-1371.6,-1737.26) 1(-1371.6,-1737.22) 1(-1371.6,-1737.22) 1(-1371.6,-1737.2) 1(-1371.6,-1737.2) 1(-1371.6,-1737.21) 1(-1371.6,-1737.21) 1(-1371.6,-1737.2) 1(-1371.6,-1737.2) 1(-1371.6,-1737.27) 1(-1371.6,-1737.27) 1(-1371.6,-1737.25) 1(-1371.6,-1737.25) 1(-1371.6,-1737.21) 1(-1371.6,-1737.21) 1(-1371.6,-1737.26) 1(-1371.6,-1737.26) 1(-1371.6,-1737.21) 1(-1371.6,-1737.21) 1(-1371.6,-1737.19) 1(-1371.6,-1737.19) 1(-1371.6,-1737.21) 1(-1371.6,-1737.21) 1(-1371.6,-1737.29) 1(-1371.6,-1737.29) 1(-1371.6,-1737.2) 1(-1371.6,-1737.2) 1(-1371.59,-1737.19) 1(-1371.59,-1737.19) 1(-1371.59,-1737.28) 1(-1371.59,-1737.28) 1(-1371.59,-1737.25) 1(-1371.59,-1737.25) 1(-1371.59,-1737.26) 1(-1371.59,-1737.26) 1(-1371.59,-1737.26) 1(-1371.59,-1737.26) 1(-1371.59,-1737.26) 1(-1371.59,-1737.26) 1(-1371.59,-1737.26) 1(-1371.59,-1737.26) 1(-1371.59,-1737.19) 1(-1371.59,-1737.19) 1(-1371.59,-1737.26) 1(-1371.59,-1737.26) 1(-1371.59,-1737.19) 1(-1371.59,-1737.19) 1(-1371.59,-1737.19) 1(-1371.59,-1737.19) 1(-1371.58,-1737.26) 1(-1371.58,-1737.26) 1(-1371.58,-1737.19) 1(-1371.58,-1737.19) 1(-1371.58,-1737.19) 1(-1371.58,-1737.19) 1(-1371.58,-1737.26) 1(-1371.58,-1737.26) 1(-1371.58,-1737.15) 1(-1371.58,-1737.15) 1(-1371.58,-1737.19) 1(-1371.58,-1737.19) 1(-1371.58,-1737.16) 1(-1371.58,-1737.16) 1(-1371.58,-1737.18) 1(-1371.58,-1737.18) 1(-1371.58,-1737.14) 1(-1371.58,-1737.14) 1(-1371.58,-1737.23) 1(-1371.58,-1737.23) 1(-1371.58,-1737.24) 1(-1371.58,-1737.24) 1(-1371.58,-1737.27) 1(-1371.58,-1737.27) 1(-1371.58,-1737.22) 1(-1371.58,-1737.22) 1(-1371.58,-1737.15) 1(-1371.58,-1737.15) 1(-1371.58,-1737.23) 1(-1371.58,-1737.23) 1(-1371.58,-1737.23) 1(-1371.58,-1737.23) 1(-1371.58,-1737.15) 1(-1371.58,-1737.15) 1(-1371.58,-1737.24) 1(-1371.58,-1737.24) 1(-1371.58,-1737.26) 1(-1371.58,-1737.26) 1(-1371.58,-1737.19) 1(-1371.58,-1737.19) 1(-1371.58,-1737.23) 1(-1371.58,-1737.23) 1(-1371.58,-1737.18) 1(-1371.58,-1737.18) 1(-1371.58,-1737.15) 1(-1371.58,-1737.15) 1(-1371.58,-1737.17) 1(-1371.58,-1737.17) 1(-1371.58,-1737.27) 1(-1371.58,-1737.27) 1(-1371.58,-1737.17) 1(-1371.58,-1737.17) 1(-1371.58,-1737.26) 1(-1371.58,-1737.26) 1(-1371.58,-1737.26) 1(-1371.58,-1737.26) 1(-1371.58,-1737.18) 1(-1371.58,-1737.18) 1(-1371.58,-1737.17) 1(-1371.58,-1737.17) 1(-1371.58,-1737.27) 1(-1371.58,-1737.27) 1(-1371.58,-1737.26) 1(-1371.58,-1737.26) 1(-1371.58,-1737.26) 1(-1371.58,-1737.26) 1(-1371.58,-1737.16) 1(-1371.58,-1737.16) 1(-1371.58,-1737.17) 1(-1371.58,-1737.17) 1(-1371.58,-1737.16) 1(-1371.58,-1737.16) 1(-1371.57,-1737.24) 1(-1371.57,-1737.24) 1(-1371.57,-1737.27) 1(-1371.57,-1737.27) 1(-1371.57,-1737.26) 1(-1371.57,-1737.26) 1(-1371.57,-1737.27) 1(-1371.57,-1737.27) 1(-1371.57,-1737.22) 1(-1371.57,-1737.22) 1(-1371.57,-1737.17) 1(-1371.57,-1737.17) 1(-1371.57,-1737.17) 1(-1371.57,-1737.17) 1(-1371.57,-1737.22) 1(-1371.57,-1737.22) 1(-1371.57,-1737.16) 1(-1371.57,-1737.16) 1(-1371.57,-1737.26) 1(-1371.57,-1737.26) 1(-1371.57,-1737.25) 1(-1371.57,-1737.25) 1(-1371.57,-1737.27) 1(-1371.57,-1737.27) 1(-1371.57,-1737.25) 1(-1371.57,-1737.25) 1(-1371.57,-1737.19) 1(-1371.57,-1737.19) 1(-1371.57,-1737.17) 1(-1371.57,-1737.17) 1(-1371.57,-1737.26) 1(-1371.57,-1737.26) 1(-1371.57,-1737.27) 1(-1371.57,-1737.27) 1(-1371.57,-1737.22) 1(-1371.57,-1737.22) 1(-1371.57,-1737.27) 1(-1371.57,-1737.27) 1(-1371.57,-1737.22) 1(-1371.57,-1737.22) 1(-1371.57,-1737.25) 1(-1371.57,-1737.25) 1(-1371.57,-1737.21) 1(-1371.57,-1737.21) 1(-1371.57,-1737.16) 1(-1371.57,-1737.16) 1(-1371.57,-1737.25) 1(-1371.57,-1737.25) 1(-1371.57,-1737.21) 1(-1371.57,-1737.21) 1(-1371.57,-1737.22) 1(-1371.57,-1737.22) 1(-1371.57,-1737.21) 1(-1371.57,-1737.21) 1(-1371.57,-1737.19) 1(-1371.57,-1737.19) 1(-1371.57,-1737.26) 1(-1371.57,-1737.26) 1(-1371.57,-1737.26) 1(-1371.57,-1737.26) 1(-1371.57,-1737.25) 1(-1371.57,-1737.25) 1(-1371.57,-1737.27) 1(-1371.57,-1737.27) 1(-1371.57,-1737.21) 1(-1371.57,-1737.21) 1(-1371.57,-1737.2) 1(-1371.57,-1737.2) 1(-1371.57,-1737.22) 1(-1371.57,-1737.22) 1(-1371.57,-1737.14) 1(-1371.57,-1737.14) 1(-1371.57,-1737.26) 1(-1371.57,-1737.26) 1(-1371.57,-1737.26) 1(-1371.57,-1737.26) 1(-1371.57,-1737.21) 1(-1371.57,-1737.21) 1(-1371.57,-1737.27) 1(-1371.57,-1737.27) 1(-1371.57,-1737.26) 1(-1371.57,-1737.26) 1(-1371.57,-1737.19) 1(-1371.57,-1737.19) 1(-1371.56,-1737.26) 1(-1371.56,-1737.26) 1(-1371.56,-1737.21) 1(-1371.56,-1737.21) 1(-1371.56,-1737.19) 1(-1371.56,-1737.19) 1(-1371.56,-1737.26) 1(-1371.56,-1737.26) 1(-1371.56,-1737.27) 1(-1371.56,-1737.27) 1(-1371.56,-1737.22) 1(-1371.56,-1737.22) 1(-1371.56,-1737.27) 1(-1371.56,-1737.27) 1(-1371.56,-1737.26) 1(-1371.56,-1737.26) 1(-1371.56,-1737.22) 1(-1371.56,-1737.22) 1(-1371.56,-1737.27) 1(-1371.56,-1737.27) 1(-1371.56,-1737.25) 1(-1371.56,-1737.25) 1(-1371.56,-1737.19) 1(-1371.56,-1737.19) 1(-1371.56,-1737.2) 1(-1371.56,-1737.2) 1(-1371.56,-1737.26) 1(-1371.56,-1737.26) 1(-1371.56,-1737.27) 1(-1371.56,-1737.27) 1(-1371.56,-1737.2) 1(-1371.56,-1737.2) 1(-1371.56,-1737.16) 1(-1371.56,-1737.16) 1(-1371.56,-1737.14) 1(-1371.56,-1737.14) 1(-1371.56,-1737.25) 1(-1371.56,-1737.25) 1(-1371.56,-1737.27) 1(-1371.56,-1737.27) 1(-1371.56,-1737.2) 1(-1371.56,-1737.2) 1(-1371.56,-1737.15) 1(-1371.56,-1737.15) 1(-1371.56,-1737.19) 1(-1371.56,-1737.19) 1(-1371.56,-1737.26) 1(-1371.56,-1737.26) 1(-1371.56,-1737.2) 1(-1371.56,-1737.2) 1(-1371.56,-1737.19) 1(-1371.56,-1737.19) 1(-1371.56,-1737.17) 1(-1371.56,-1737.17) 1(-1371.56,-1737.25) 1(-1371.56,-1737.25) 1(-1371.56,-1737.27) 1(-1371.56,-1737.27) 1(-1371.56,-1737.26) 1(-1371.56,-1737.26) 1(-1371.56,-1737.17) 1(-1371.56,-1737.17) 1(-1371.56,-1737.19) 1(-1371.56,-1737.19) 1(-1371.56,-1737.19) 1(-1371.56,-1737.19) 1(-1371.55,-1737.18) 1(-1371.55,-1737.18) 1(-1371.55,-1737.26) 1(-1371.55,-1737.26) 1(-1371.55,-1737.2) 1(-1371.55,-1737.2) 1(-1371.55,-1737.2) 1(-1371.55,-1737.2) 1(-1371.55,-1737.27) 1(-1371.55,-1737.27) 1(-1371.55,-1737.2) 1(-1371.55,-1737.2) 1(-1371.55,-1737.19) 1(-1371.55,-1737.19) 1(-1371.55,-1737.27) 1(-1371.55,-1737.27) 1(-1371.55,-1737.19) 1(-1371.55,-1737.19) 1(-1371.55,-1737.19) 1(-1371.55,-1737.19) 1(-1371.55,-1737.19) 1(-1371.55,-1737.19) 1(-1371.55,-1737.26) 1(-1371.55,-1737.26) 1(-1371.55,-1737.26) 1(-1371.55,-1737.26) 1(-1371.55,-1737.27) 1(-1371.55,-1737.27) 1(-1371.55,-1737.26) 1(-1371.55,-1737.26) 1(-1371.55,-1737.19) 1(-1371.55,-1737.19) 1(-1371.55,-1737.19) 1(-1371.55,-1737.19) 1(-1371.55,-1737.17) 1(-1371.55,-1737.17) 1(-1371.55,-1737.26) 1(-1371.55,-1737.26) 1(-1371.55,-1737.27) 1(-1371.55,-1737.27) 1(-1371.55,-1737.26) 1(-1371.55,-1737.26) 1(-1371.55,-1737.25) 1(-1371.55,-1737.25) 1(-1371.55,-1737.18) 1(-1371.55,-1737.18) 1(-1371.55,-1737.25) 1(-1371.55,-1737.25) 1(-1371.55,-1737.14) 1(-1371.55,-1737.14) 1(-1371.55,-1737.25) 1(-1371.55,-1737.25) 1(-1371.55,-1737.17) 1(-1371.55,-1737.17) 1(-1371.55,-1737.25) 1(-1371.55,-1737.25) 1(-1371.55,-1737.19) 1(-1371.55,-1737.19) 1(-1371.55,-1737.18) 1(-1371.55,-1737.18) 1(-1371.55,-1737.15) 1(-1371.55,-1737.15) 1(-1371.55,-1737.18) 1(-1371.55,-1737.18) 1(-1371.55,-1737.14) 1(-1371.55,-1737.14) 1(-1371.55,-1737.26) 1(-1371.55,-1737.26) 1(-1371.55,-1737.27) 1(-1371.55,-1737.27) 1(-1371.55,-1737.16) 1(-1371.55,-1737.16) 1(-1371.55,-1737.27) 1(-1371.55,-1737.27) 1(-1371.55,-1737.17) 1(-1371.55,-1737.17) 1(-1371.55,-1737.15) 1(-1371.55,-1737.15) 1(-1371.55,-1737.26) 1(-1371.55,-1737.26) 1(-1371.55,-1737.18) 1(-1371.55,-1737.18) 1(-1371.55,-1737.14) 1(-1371.55,-1737.14) 1(-1371.55,-1737.18) 1(-1371.55,-1737.18) 1(-1371.55,-1737.17) 1(-1371.55,-1737.17) 1(-1371.55,-1737.15) 1(-1371.55,-1737.15) 1(-1371.55,-1737.15) 1(-1371.55,-1737.15) 1(-1371.55,-1737.16) 1(-1371.55,-1737.16) 1(-1371.55,-1737.27) 1(-1371.55,-1737.27) 1(-1371.55,-1737.17) 1(-1371.55,-1737.17) 1(-1371.55,-1737.16) 1(-1371.55,-1737.16) 1(-1371.55,-1737.14) 1(-1371.55,-1737.14) 1(-1371.55,-1737.27) 1(-1371.55,-1737.27) 1(-1371.54,-1737.18) 1(-1371.54,-1737.18) 1(-1371.54,-1737.27) 1(-1371.54,-1737.27) 1(-1371.54,-1737.19) 1(-1371.54,-1737.19) 1(-1371.54,-1737.27) 1(-1371.54,-1737.27) 1(-1371.54,-1737.17) 1(-1371.54,-1737.17) 1(-1371.54,-1737.16) 1(-1371.54,-1737.16) 1(-1371.54,-1737.14) 1(-1371.54,-1737.14) 1(-1371.54,-1737.18) 1(-1371.54,-1737.18) 1(-1371.54,-1737.14) 1(-1371.54,-1737.14) 1(-1371.54,-1737.17) 1(-1371.54,-1737.17) 1(-1371.54,-1737.26) 1(-1371.54,-1737.26) 1(-1371.54,-1737.15) 1(-1371.54,-1737.15) 1(-1371.54,-1737.25) 1(-1371.54,-1737.25) 1(-1371.54,-1737.19) 1(-1371.54,-1737.19) 1(-1371.54,-1737.16) 1(-1371.54,-1737.16) 1(-1371.54,-1737.19) 1(-1371.54,-1737.19) 1(-1371.54,-1737.18) 1(-1371.54,-1737.18) 1(-1371.54,-1737.14) 1(-1371.54,-1737.14) 1(-1371.54,-1737.25) 1(-1371.54,-1737.25) 1(-1371.54,-1737.18) 1(-1371.54,-1737.18) 1(-1371.54,-1737.15) 1(-1371.54,-1737.15) 1(-1371.54,-1737.25) 1(-1371.54,-1737.25) 1(-1371.54,-1737.15) 1(-1371.54,-1737.15) 1(-1371.54,-1737.17) 1(-1371.54,-1737.17) 1(-1371.54,-1737.26) 1(-1371.54,-1737.26) 1(-1371.54,-1737.17) 1(-1371.54,-1737.17) 1(-1371.54,-1737.27) 1(-1371.54,-1737.27) 1(-1371.54,-1737.18) 1(-1371.54,-1737.18) 1(-1371.54,-1737.26) 1(-1371.54,-1737.26) 1(-1371.54,-1737.25) 1(-1371.54,-1737.25) 1(-1371.54,-1737.15) 1(-1371.54,-1737.15) 1(-1371.54,-1737.27) 1(-1371.54,-1737.27) 1(-1371.54,-1737.18) 1(-1371.54,-1737.18) 1(-1371.54,-1737.17) 1(-1371.54,-1737.17) 1(-1371.54,-1737.27) 1(-1371.54,-1737.27) 1(-1371.54,-1737.26) 1(-1371.54,-1737.26) 1(-1371.54,-1737.17) 1(-1371.54,-1737.17) 1(-1371.54,-1737.15) 1(-1371.54,-1737.15) 1(-1371.54,-1737.26) 1(-1371.54,-1737.26) 1(-1371.54,-1737.18) 1(-1371.54,-1737.18) 1(-1371.54,-1737.14) 1(-1371.54,-1737.14) 1(-1371.54,-1737.2) 1(-1371.54,-1737.2) 1(-1371.54,-1737.21) 1(-1371.54,-1737.21) 1(-1371.54,-1737.25) 1(-1371.54,-1737.25) 1(-1371.54,-1737.25) 1(-1371.54,-1737.25) 1(-1371.54,-1737.19) 1(-1371.54,-1737.19) 1(-1371.54,-1737.29) 1(-1371.54,-1737.29) 1(-1371.54,-1737.21) 1(-1371.54,-1737.21) 1(-1371.54,-1737.14) 1(-1371.54,-1737.14) 1(-1371.53,-1737.25) 1(-1371.53,-1737.25) 1(-1371.53,-1737.21) 1(-1371.53,-1737.21) 1(-1371.53,-1737.26) 1(-1371.53,-1737.26) 1(-1371.53,-1737.2) 1(-1371.53,-1737.2) 1(-1371.53,-1737.21) 1(-1371.53,-1737.21) 1(-1371.53,-1737.2) 1(-1371.53,-1737.2) 1(-1371.53,-1737.25) 1(-1371.53,-1737.25) 1(-1371.53,-1737.25) 1(-1371.53,-1737.25) 1(-1371.53,-1737.2) 1(-1371.53,-1737.2) 1(-1371.53,-1737.17) 1(-1371.53,-1737.17) 1(-1371.53,-1737.25) 1(-1371.53,-1737.25) 1(-1371.53,-1737.18) 1(-1371.53,-1737.18) 1(-1371.53,-1737.15) 1(-1371.53,-1737.15) 1(-1371.53,-1737.26) 1(-1371.53,-1737.26) 1(-1371.53,-1737.21) 1(-1371.53,-1737.21) 1(-1371.53,-1737.21) 1(-1371.53,-1737.21) 1(-1371.53,-1737.2) 1(-1371.53,-1737.2) 1(-1371.53,-1737.18) 1(-1371.53,-1737.18) 1(-1371.53,-1737.17) 1(-1371.53,-1737.17) 1(-1371.53,-1737.21) 1(-1371.53,-1737.21) 1(-1371.53,-1737.15) 1(-1371.53,-1737.15) 1(-1371.53,-1737.17) 1(-1371.53,-1737.17) 1(-1371.53,-1737.16) 1(-1371.53,-1737.16) 1(-1371.53,-1737.14) 1(-1371.53,-1737.14) 1(-1371.53,-1737.21) 1(-1371.53,-1737.21) 1(-1371.53,-1737.17) 1(-1371.53,-1737.17) 1(-1371.53,-1737.23) 1(-1371.53,-1737.23) 1(-1371.53,-1737.22) 1(-1371.53,-1737.22) 1(-1371.53,-1737.18) 1(-1371.53,-1737.18) 1(-1371.53,-1737.18) 1(-1371.53,-1737.18) 1(-1371.53,-1737.15) 1(-1371.53,-1737.15) 1(-1371.53,-1737.21) 1(-1371.53,-1737.21) 1(-1371.53,-1737.17) 1(-1371.53,-1737.17) 1(-1371.53,-1737.16) 1(-1371.53,-1737.16) 1(-1371.53,-1737.25) 1(-1371.53,-1737.25) 1(-1371.53,-1737.17) 1(-1371.53,-1737.17) 1(-1371.53,-1737.14) 1(-1371.53,-1737.14) 1(-1371.53,-1737.18) 1(-1371.53,-1737.18) 1(-1371.53,-1737.15) 1(-1371.53,-1737.15) 1(-1371.53,-1737.14) 1(-1371.53,-1737.14) 1(-1371.53,-1737.21) 1(-1371.53,-1737.21) 1(-1371.53,-1737.23) 1(-1371.53,-1737.23) 1(-1371.53,-1737.23) 1(-1371.53,-1737.23) 1(-1371.53,-1737.25) 1(-1371.53,-1737.25) 1(-1371.53,-1737.18) 1(-1371.53,-1737.18) 1(-1371.53,-1737.17) 1(-1371.53,-1737.17) 1(-1371.53,-1737.16) 1(-1371.53,-1737.16) 1(-1371.53,-1737.2) 1(-1371.53,-1737.2) 1(-1371.53,-1737.18) 1(-1371.53,-1737.18) 1(-1371.53,-1737.16) 1(-1371.53,-1737.16) 1(-1371.53,-1737.15) 1(-1371.53,-1737.15) 1(-1371.52,-1737.23) 1(-1371.52,-1737.23) 1(-1371.52,-1737.22) 1(-1371.52,-1737.22) 1(-1371.52,-1737.25) 1(-1371.52,-1737.25) 1(-1371.52,-1737.22) 1(-1371.52,-1737.22) 1(-1371.52,-1737.14) 1(-1371.52,-1737.14) 1(-1371.52,-1737.23) 1(-1371.52,-1737.23) 1(-1371.52,-1737.25) 1(-1371.52,-1737.25) 1(-1371.52,-1737.14) 1(-1371.52,-1737.14) 1(-1371.52,-1737.26) 1(-1371.52,-1737.26) 1(-1371.52,-1737.25) 1(-1371.52,-1737.25) 1(-1371.52,-1737.22) 1(-1371.52,-1737.22) 1(-1371.52,-1737.21) 1(-1371.52,-1737.21) 1(-1371.52,-1737.2) 1(-1371.52,-1737.2) 1(-1371.52,-1737.18) 1(-1371.52,-1737.18) 1(-1371.52,-1737.15) 1(-1371.52,-1737.15) 1(-1371.52,-1737.17) 1(-1371.52,-1737.17) 1(-1371.52,-1737.17) 1(-1371.52,-1737.17) 1(-1371.52,-1737.2) 1(-1371.52,-1737.2) 1(-1371.52,-1737.15) 1(-1371.52,-1737.15) 1(-1371.52,-1737.26) 1(-1371.52,-1737.26) 1(-1371.52,-1737.22) 1(-1371.52,-1737.22) 1(-1371.52,-1737.21) 1(-1371.52,-1737.21) 1(-1371.52,-1737.21) 1(-1371.52,-1737.21) 1(-1371.52,-1737.2) 1(-1371.52,-1737.2) 1(-1371.52,-1737.16) 1(-1371.52,-1737.16) 1(-1371.52,-1737.28) 1(-1371.52,-1737.28) 1(-1371.52,-1737.15) 1(-1371.52,-1737.15) 1(-1371.52,-1737.21) 1(-1371.52,-1737.21) 1(-1371.52,-1737.24) 1(-1371.52,-1737.24) 1(-1371.52,-1737.21) 1(-1371.52,-1737.21) 1(-1371.52,-1737.26) 1(-1371.52,-1737.26) 1(-1371.52,-1737.26) 1(-1371.52,-1737.26) 1(-1371.52,-1737.2) 1(-1371.52,-1737.2) 1(-1371.52,-1737.18) 1(-1371.52,-1737.18) 1(-1371.52,-1737.18) 1(-1371.52,-1737.18) 1(-1371.52,-1737.15) 1(-1371.52,-1737.15) 1(-1371.52,-1737.26) 1(-1371.52,-1737.26) 1(-1371.52,-1737.26) 1(-1371.52,-1737.26) 1(-1371.52,-1737.25) 1(-1371.52,-1737.25) 1(-1371.52,-1737.22) 1(-1371.52,-1737.22) 1(-1371.52,-1737.21) 1(-1371.52,-1737.21) 1(-1371.52,-1737.21) 1(-1371.52,-1737.21)